# Altium PCB EB1_Spartan_III_1_02.PcbDoc (part 3 of 4)
Units mm, origin at the board's own origin, x right, y up, seen from the top; angles counter-clockwise.
Board outline 165.1 x 115.01 mm, 6 copper layers (Top Layer, MidLayer1, VCC Plane, GND Plane, MidLayer2, Bottom Layer); 356 components, 386 nets, 1788 pads, 779 vias.
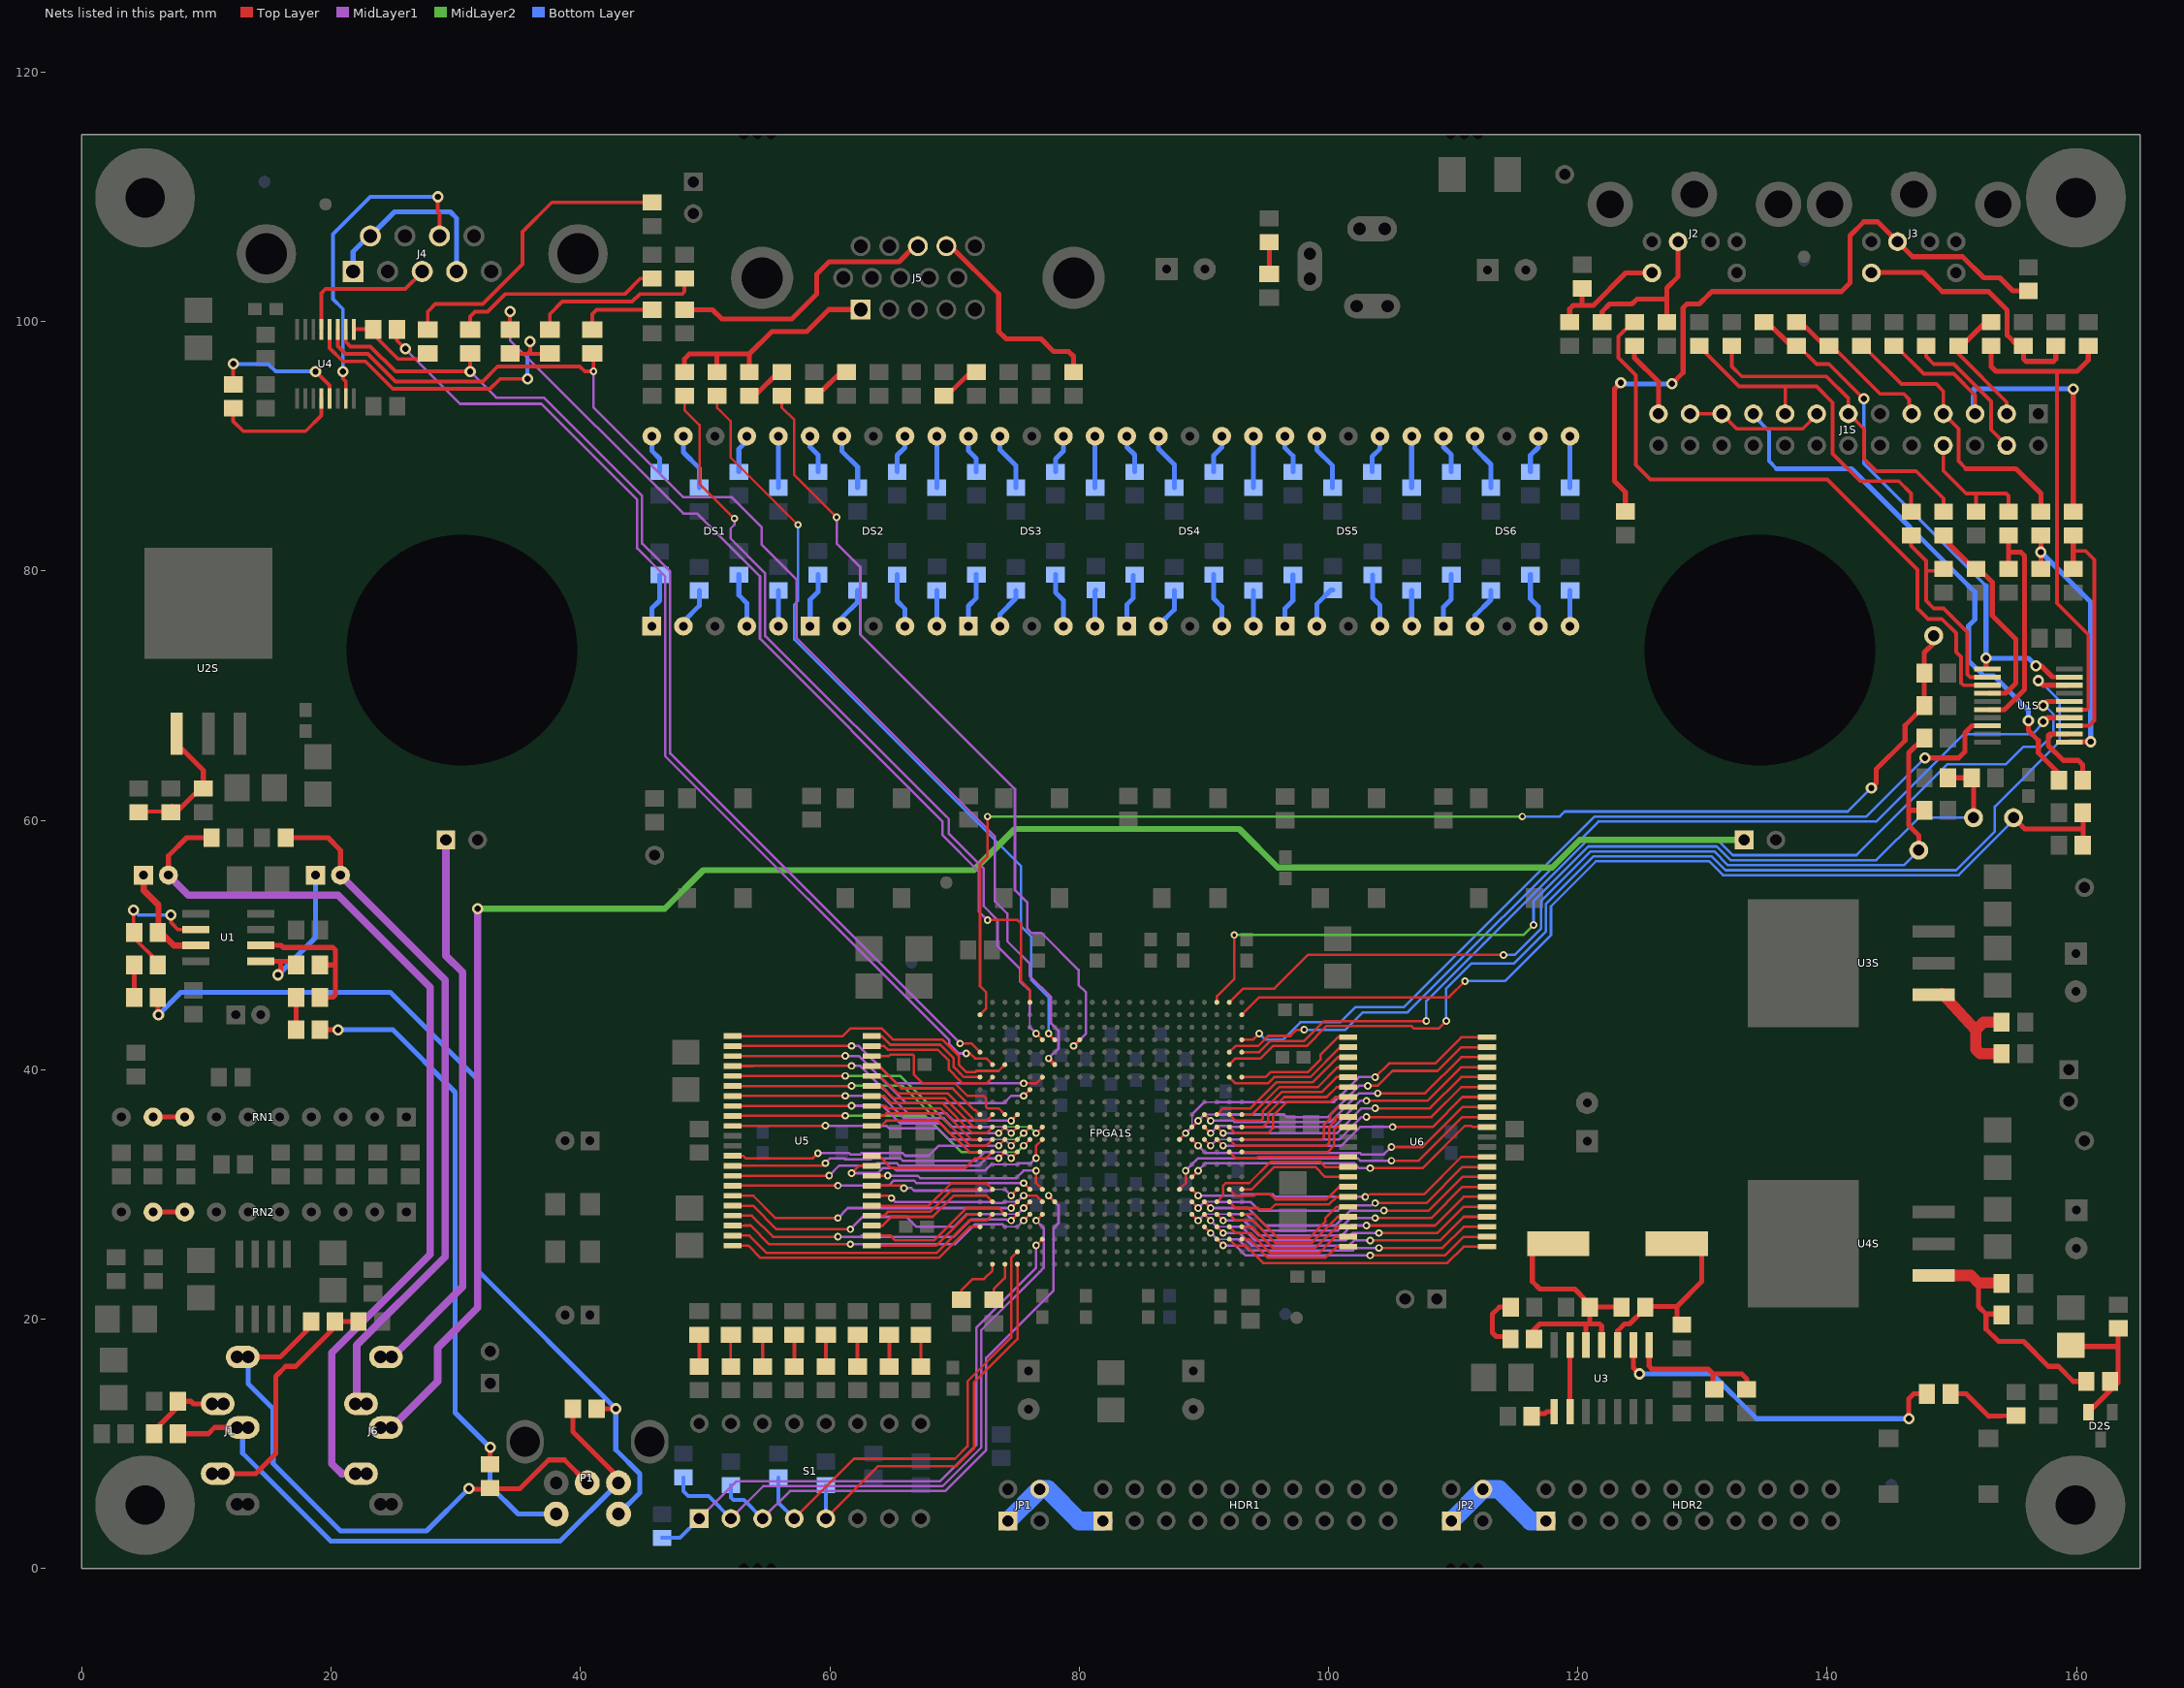
[diagram p7: the nets of this part, all layers, seen from the top]

## Via types
v1: diameter 0.6, hole 0.3, Top Layer to Bottom Layer, tented both sides, 427 vias
v2: diameter 1.6, hole 1, Top Layer to Bottom Layer, 224 vias
v3: diameter 0.9, hole 0.5, Top Layer to Bottom Layer, tented both sides, 126 vias
v4: diameter 1.27, hole 0.711, Top Layer to Bottom Layer, tented both sides, 2 vias

## Nets (pads, with @x,y where several pads share a name; then routed paths per layer and width w, separated by ;. In a path a pad name is that pad's centre, name@x,y a point inside that pad or via, vN(x,y) a via of type N, cw(c..) or ccw(c..) an arc to the next point about the centre after c; other vN are vias at no path point) (continued)
NetC22_1: C22.1 U4.4 | length 10.3
  Top Layer w0.3: C22.1@12.15,93.05 12.15,92 12.95,91.2 17.95,91.2 19.225,92.475 U4.4@19.225,93.825
NetC22_2: C22.2 U4.5 | length 11.1
  Top Layer w0.3: C22.2@12.15,94.95 v3(12.15,96.6) ; v3(18.75,96) 19.875,94.875 U4.5@19.875,93.825
  Bottom Layer w0.3: v3(12.15,96.6) 14.95,96.6 15.55,96 v3(18.75,96)
NetC30_2: C30.2 L1.2 | length 4.9
  Top Layer w0.4: C30.2@114.62,20.955 113.705,20.955 113.15,20.4 113.15,18.9 113.45,18.6 114.6,18.6 L1.2@114.7,18.6
NetC31_1: C31.1 CR1.2 R112.2 U3.3 | length 15.3
  Top Layer w0.4: U3.3@123.19,17.915 123.19,19.04 123.75,19.6 124.15,19.6 R112.2@125.35,20.8 ; R112.2@125.35,21 125.355,21.005 125.41,21.005 127.955,21.005 ; CR1.2@127.94,26.035 129.515,26.035 129.95,25.6 129.95,23 127.955,21.005 ; C31.1@127.95,19.9 127.955,19.905 127.955,21.005
NetC32_2: C32.2 CR1.1 L1.1 R112.1 U3.4 U3.5 | length 23.5
  Top Layer w0.4: L1.1@116.42,18.6 116.42,19.07 116.95,19.6 120.55,19.6 ; CR1.1@118.35,26 116.35,26 116.35,23 116.95,22.4 119.75,22.4 C32.2@120.75,21.4 ; U3.5@120.65,17.915 120.65,19.5 120.55,19.6 ; C32.2@120.95,21 120.95,20.955 120.95,19.6 ; C32.2@120.965,20.955 R112.1@123.51,20.955 ; U3.4@121.92,17.915 121.92,19.43 121.75,19.6 120.95,19.6 ; 120.55,19.6 120.95,19.6
NetC33_1: C33.1 P1.2 R115.2 | length 53.3
  Top Layer w0.4: C33.1@19.1,43.2 v3(20.55,43.2) ; R115.2@32.75,8.3 R115.2@32.75,8.35 v3(32.75,9.7)
  Bottom Layer w0.4: v3(20.55,43.2) 24.95,43.2 29.95,38.2 29.95,12.5 v3(32.75,9.7) 32.75,6.6 34.99,4.36 P1.2@38.05,4.36
NetC33_2: C33.2 R116.1 | length 2.6
  Top Layer w0.4: C33.2@17.2,43.2 R116.1@17.2,45.8
NetC35_1: C35.1 P1.5 R114.2 | length 73.1
  Top Layer w0.4: C35.1@6.1,45.8 6.1,44.45 v3(6.15,44.4) ; R114.2@41.3,12.8 v3(42.85,12.8)
  Bottom Layer w0.4: v3(6.15,44.4) 7.95,46.2 24.75,46.2 31.75,39.2 31.75,23.9 42.84,12.81 42.84,12.8 42.84,9.51 44.75,7.6 44.75,6.06 P1.5@43.05,4.36
NetC35_2: C35.2 R117.1 | length 2.6
  Top Layer w0.4: C35.2@4.2,45.8 R117.1@4.2,48.4
NetC36_1: C36.1 R118.2 U1.1 | length 13.5
  Top Layer w0.4: U1.1@14.35,48.695 15.95,48.695 ; v3(15.75,47.6) 15.95,47.8 15.95,48.695 ; R118.2@17.35,48.6 17.255,48.695 17.2,48.695 15.95,48.695
  Bottom Layer w0.4: v3(15.75,47.6) 18.75,50.6 C36.1@18.75,55.6
NetC36_2: C36.2 J6.4 J6.4A J6.4B R120.2 | length 56.7
  Top Layer w0.4: R120.2@16.35,58.6 19.75,58.6 20.75,57.6 C36.2@20.75,55.6
  MidLayer1 w0.6: C36.2@20.75,55.6 29.15,47.2 29.15,25 22.05,17.9 22.05,13.3 J6.4B@22.15,13.2 ; J6.4B@21.95,13.2 J6.4B@22.15,13.2 ; J6.4A@22.75,13.3 J6.4A@22.65,13.2 ; J6.4A@22.85,13.2 J6.4A@22.65,13.2 ; J6.4B@22.15,13.2 J6.4@22.4,13.2 J6.4A@22.65,13.2
NetC38_1: C38.1 R119.2 U1.7 | length 8.4
  Top Layer w0.5: C38.1@4.95,55.6 4.95,54.4 6.15,53.2 6.15,51.2 6.225,51.125 7.385,49.965 U1.7@9.15,49.965
NetC38_2: C38.2 J6.2 J6.2A J6.2B R121.2 | length 74.9
  Top Layer w0.4: C38.2@6.95,55.6 6.95,57.15 8.4,58.6 R121.2@10.4,58.6
  MidLayer1 w0.6: C38.2@6.95,55.6 8.55,54 20.55,54 27.95,46.6 27.95,25.2 20.05,17.3 20.05,8.4 20.85,7.6 J6.2B@21.95,7.6 J6.2@22.4,7.6 J6.2A@22.85,7.6
NetC79S_2: C79S.2 D2S.2 R30S.1 R38S.2 | length 12.1
  Top Layer w0.4: C79S.2@159.95,17.8 163.35,17.8 ; D2S.2@160.975,12.53 163.073,14.627 163.35,14.905 163.35,15 163.35,17.8 ; R30S.1@163.35,19.25 163.35,17.8
  Top Layer w0.5: 162.55,14.2 163.025,14.675 163.05,14.7 R38S.2@163.05,15
NetDS1_1: DS1.1 R41.1 | length 4.4
  Bottom Layer w0.4: DS1.1@45.72,75.565 45.72,76.99 46.35,77.62 R41.1@46.35,79.67
NetDS1_2: DS1.2 R37.1 | length 3.4
  Bottom Layer w0.4: DS1.2@48.26,75.565 48.26,75.93 49.53,77.2 R37.1@49.53,78.425
NetDS1_4: DS1.4 R33.1 | length 4.4
  Bottom Layer w0.4: R33.1@52.705,79.695 52.705,78.065 53.34,77.43 DS1.4@53.34,75.565
NetDS1_5: DS1.5 R53.1 | length 2.9
  Bottom Layer w0.4: DS1.5@55.88,75.565 R53.1@55.88,78.425
NetDS1_6: DS1.6 R29.1 | length 4.1
  Bottom Layer w0.4: R29.1@55.88,86.675 DS1.6@55.88,90.805
NetDS1_7: DS1.7 R25.1 | length 3.1
  Bottom Layer w0.4: R25.1@52.705,87.945 52.705,89.775 53.34,90.41 DS1.7@53.34,90.805
NetDS1_9: DS1.9 R45.1 | length 4.7
  Bottom Layer w0.4: DS1.9@48.26,90.805 48.26,89.51 49.53,88.24 R45.1@49.53,86.675
NetDS1_10: DS1.10 R49.1 | length 3.1
  Bottom Layer w0.4: DS1.10@45.72,90.805 45.72,89.65 46.355,89.015 R49.1@46.355,87.945
NetDS2_1: DS2.1 R42.1 | length 4.4
  Bottom Layer w0.4: DS2.1@58.42,75.565 58.42,77.69 59.055,78.325 R42.1@59.055,79.695
NetDS2_2: DS2.2 R38.1 | length 3.4
  Bottom Layer w0.4: DS2.2@60.96,75.565 60.96,76.23 62.23,77.5 R38.1@62.23,78.425
NetDS2_4: DS2.4 R34.1 | length 4.4
  Bottom Layer w0.4: R34.1@65.405,79.695 65.405,77.565 66.04,76.93 DS2.4@66.04,75.565
NetDS2_5: DS2.5 R54.1 | length 2.9
  Bottom Layer w0.4: DS2.5@68.58,75.565 R54.1@68.58,78.425
NetDS2_6: DS2.6 R30.1 | length 4.1
  Bottom Layer w0.4: R30.1@68.58,86.675 DS2.6@68.58,90.805
NetDS2_7: DS2.7 R26.1 | length 3.1
  Bottom Layer w0.4: R26.1@65.405,87.945 65.405,89.275 66.04,89.91 DS2.7@66.04,90.805
NetDS2_9: DS2.9 R46.1 | length 4.7
  Bottom Layer w0.4: DS2.9@60.96,90.805 60.96,89.61 62.23,88.34 R46.1@62.23,86.675
NetDS2_10: DS2.10 R50.1 | length 3.1
  Bottom Layer w0.4: DS2.10@58.42,90.805 58.42,89.95 59.055,89.315 R50.1@59.055,87.945
NetDS3_1: DS3.1 R43.1 | length 4.4
  Bottom Layer w0.4: DS3.1@71.12,75.565 71.12,77.19 71.755,77.825 R43.1@71.755,79.695
NetDS3_2: DS3.2 R39.1 | length 3.4
  Bottom Layer w0.4: DS3.2@73.66,75.565 73.66,76.53 74.93,77.8 R39.1@74.93,78.425
NetDS3_4: DS3.4 R35.1 | length 4.4
  Bottom Layer w0.4: R35.1@78.105,79.695 78.105,78.265 78.74,77.63 DS3.4@78.74,75.565
NetDS3_5: DS3.5 R55.1 | length 2.9
  Bottom Layer w0.4: DS3.5@81.28,75.565 81.28,78.4 R55.1@81.35,78.47
NetDS3_6: DS3.6 R31.1 | length 4.1
  Bottom Layer w0.4: R31.1@81.28,86.675 DS3.6@81.28,90.805
NetDS3_7: DS3.7 R27.1 | length 3.1
  Bottom Layer w0.4: R27.1@78.105,87.945 78.105,88.975 78.74,89.61 DS3.7@78.74,90.805
NetDS3_9: DS3.9 R47.1 | length 4.7
  Bottom Layer w0.4: DS3.9@73.66,90.805 73.66,89.71 74.93,88.44 R47.1@74.93,86.675
NetDS3_10: DS3.10 R51.1 | length 3.1
  Bottom Layer w0.4: DS3.10@71.12,90.805 71.12,89.65 71.755,89.015 R51.1@71.755,87.945
NetDS4_1: DS4.1 R44.1 | length 4.3
  Bottom Layer w0.4: DS4.1@83.82,75.565 83.82,77.29 84.35,77.82 R44.1@84.35,79.62
NetDS4_2: DS4.2 R40.1 | length 3.4
  Bottom Layer w0.4: DS4.2@86.36,75.565 86.36,75.63 87.63,76.9 R40.1@87.63,78.425
NetDS4_4: DS4.4 R36.1 | length 4.4
  Bottom Layer w0.4: R36.1@90.805,79.695 90.805,77.765 91.44,77.13 DS4.4@91.44,75.565
NetDS4_5: DS4.5 R56.1 | length 2.9
  Bottom Layer w0.4: DS4.5@93.98,75.565 R56.1@93.98,78.425
NetDS4_6: DS4.6 R32.1 | length 4.1
  Bottom Layer w0.4: R32.1@93.98,86.675 DS4.6@93.98,90.805
NetDS4_7: DS4.7 R28.1 | length 3.1
  Bottom Layer w0.4: R28.1@90.805,87.945 90.805,89.275 91.44,89.91 DS4.7@91.44,90.805
NetDS4_9: DS4.9 R48.1 | length 4.7
  Bottom Layer w0.4: DS4.9@86.36,90.805 86.36,89.81 87.63,88.54 R48.1@87.63,86.675
NetDS4_10: DS4.10 R52.1 | length 3.1
  Bottom Layer w0.4: DS4.10@83.82,90.805 83.82,89.95 84.455,89.315 R52.1@84.455,87.945
NetDS5_1: DS5.1 R65.1 | length 4.4
  Bottom Layer w0.4: DS5.1@96.52,75.565 96.52,76.99 97.15,77.62 R65.1@97.15,79.67
NetDS5_2: DS5.2 R63.1 | length 3.5
  Bottom Layer w0.4: DS5.2@99.06,75.565 99.06,77.33 100.2,78.47 R63.1@100.35,78.47
NetDS5_4: DS5.4 R61.1 | length 4.4
  Bottom Layer w0.4: R61.1@103.54,79.675 103.54,77.83 104.14,77.23 DS5.4@104.14,75.565
NetDS5_5: DS5.5 R71.1 | length 2.9
  Bottom Layer w0.4: DS5.5@106.68,75.565 R71.1@106.68,78.425
NetDS5_6: DS5.6 R59.1 | length 4.1
  Bottom Layer w0.4: R59.1@106.68,86.675 DS5.6@106.68,90.805
NetDS5_7: DS5.7 R57.1 | length 3.1
  Bottom Layer w0.4: R57.1@103.505,87.945 103.505,89.175 104.14,89.81 DS5.7@104.14,90.805
NetDS5_9: DS5.9 R67.1 | length 4.7
  Bottom Layer w0.4: DS5.9@99.06,90.805 99.06,89.71 100.33,88.44 R67.1@100.33,86.675
NetDS5_10: DS5.10 R69.1 | length 3.1
  Bottom Layer w0.4: DS5.10@96.52,90.805 96.52,89.85 97.155,89.215 R69.1@97.155,87.945
NetDS6_1: DS6.1 R66.1 | length 4.4
  Bottom Layer w0.4: DS6.1@109.22,75.565 109.22,77.09 109.855,77.725 R66.1@109.855,79.695
NetDS6_2: DS6.2 R64.1 | length 3.4
  Bottom Layer w0.4: DS6.2@111.76,75.565 111.76,76.43 113.03,77.7 R64.1@113.03,78.425
NetDS6_4: DS6.4 R62.1 | length 4.4
  Bottom Layer w0.4: R62.1@116.205,79.695 116.205,77.765 116.84,77.13 DS6.4@116.84,75.565
NetDS6_5: DS6.5 R72.1 | length 2.9
  Bottom Layer w0.4: DS6.5@119.38,75.565 R72.1@119.38,78.425
NetDS6_6: DS6.6 R60.1 | length 4.1
  Bottom Layer w0.4: R60.1@119.38,86.675 DS6.6@119.38,90.805
NetDS6_7: DS6.7 R58.1 | length 3.1
  Bottom Layer w0.4: R58.1@116.205,87.945 116.205,89.275 116.84,89.91 DS6.7@116.84,90.805
NetDS6_9: DS6.9 R68.1 | length 4.7
  Bottom Layer w0.4: DS6.9@111.76,90.805 111.76,89.81 113.03,88.54 R68.1@113.03,86.675
NetDS6_10: DS6.10 R70.1 | length 3.1
  Bottom Layer w0.4: DS6.10@109.22,90.805 109.22,89.95 109.855,89.315 R70.1@109.855,87.945
NetFPGA1S_A20: FPGA1S.A20 R8S.2 R12S.2 TP4S.1 | length 76.4
  Top Layer w0.2: FPGA1S.A20@91.05,45.4 91.05,45.9 92.45,47.3 v1(92.45,50.8)
  Top Layer w0.4: R8S.2@149.7,63.4 R12S.2@151.6,63.4 151.75,63.25 TP4S.1@151.75,60.2
  MidLayer2 w0.2: v1(92.45,50.8) 115.65,50.8 v1(116.45,51.6)
  Bottom Layer w0.2: v1(116.45,51.6) 116.45,53.5 120.85,57.9 131.15,57.9 132.25,56.8 143.95,56.8 147.35,60.2 TP4S.1@151.75,60.2
NetFPGA1S_A21: FPGA1S.A21 R7S.2 R11S.2 TP3S.1 | length 73.7
  Top Layer w0.2: FPGA1S.A21@92.05,45.4 93.15,46.5 95.65,46.5 98.35,49.2 v1(114.05,49.2)
  Top Layer w0.4: TP3S.1@147.35,57.6 147.35,58.8 146.55,59.6 146.55,60.8 ; R7S.2@147.8,60.8 146.55,60.8 ; R11S.2@147.8,66.6 147.75,66.6 146.55,65.4 146.55,60.8
  Bottom Layer w0.2: v1(114.05,49.2) 114.95,49.2 117.05,51.3 117.05,53.5 121.05,57.5 130.95,57.5 132.05,56.4 146.15,56.4 TP3S.1@147.35,57.6
NetFPGA1S_AB2: FPGA1S.AB2 R3S.2 | length 4.5
  Top Layer w0.2: R3S.2@70.55,21.4 R3S.2@70.625,21.475 ; R3S.2@70.55,21.55 70.55,22.3 71.462,23.212 72.362,23.212 73.05,23.9 FPGA1S.AB2@73.05,24.4
NetFPGA1S_AB3: FPGA1S.AB3 R4S.2 | length 3.2
  Top Layer w0.2: R4S.2@73.15,21.55 73.15,22.4 74.05,23.3 FPGA1S.AB3@74.05,24.4
NetFPGA1S_B1: FPGA1S.B1 R5S.2 R9S.2 TP1S.1 | length 103
  Top Layer w0.2: FPGA1S.B1@72.05,44.4 72.55,44.9 72.55,46.2 72.05,46.7 72.05,56.5 72.65,57.1 v1(72.65,60.3)
  Top Layer w0.4: v3(143.55,62.6) 143.95,63 143.95,64.1 146.25,66.4 146.25,67.6 R9S.2@147.8,69.15 ; R9S.2@147.8,68.85 R9S.2@147.8,69.15 ; TP1S.1@148.55,74.8 148.55,74.2 147.8,73.45 R5S.2@147.8,71.8 R9S.2@147.8,69.2 R9S.2@147.8,69.15
  MidLayer2 w0.2: v1(72.65,60.3) v1(115.55,60.3)
  Bottom Layer w0.2: v1(115.55,60.3) 118.55,60.3 118.95,60.7 141.65,60.7 v3(143.55,62.6)
NetFPGA1S_B22: FPGA1S.B22 R6S.2 R10S.2 TP2S.1 | length 79.4
  Top Layer w0.2: FPGA1S.B22@93.05,44.4 94.45,45.8 109.65,45.8 v1(110.95,47.1)
  Top Layer w0.4: TP2S.1@154.95,60.2 155.85,59.3 160.55,59.3 ; R10S.2@160.5,58 160.55,58.05 160.55,59.3 ; R6S.2@160.55,60.6 160.55,59.3
  Bottom Layer w0.2: v1(110.95,47.1) 114.15,47.1 117.85,50.8 117.85,53.1 121.45,56.7 130.55,56.7 131.65,55.6 150.55,55.6 154.95,60 TP2S.1@154.95,60.2
NetJ1_2: J1.2 J1.2A J1.2B R3.2 R113.1 | length 19.8
  Top Layer w0.4: J1.2A@11.35,7.6 13.95,7.6 15.55,9.2 15.55,15.4 16.35,16.2 17.15,16.2 20.3,19.35 R113.1@20.3,19.8 R3.2@22.2,19.8
NetJ1_4: J1.4 J1.4A J1.4B R1.1 R2.2 | length 6.7
  Top Layer w0.4: R1.1@5.95,11.2 7.7,12.95 R2.2@7.7,13.4 8.75,13.4 8.95,13.2 J1.4B@10.45,13.2 J1.4@10.9,13.2 J1.4A@11.35,13.2
NetJ1S_2: J1S.2 R14S.2 R28S.2 | length 10
  Top Layer w0.3: R14S.2@150.55,98.05 150.55,97.4 154.41,93.54 J1S.2@154.41,92.6
  Top Layer w0.4: R14S.2@150.495,98.05 150.495,98.11 150.55,98.11 150.86,98.11 R28S.2@152.65,99.9
NetJ1S_3: J1S.3 R15S.2 R27S.2 | length 29.5
  Top Layer w0.3: R15S.2@145.35,98.05 145.5,98.05 147.75,95.8 150.15,95.8 151.87,94.08 J1S.3@151.87,92.6
  Top Layer w0.4: R27S.2@159.75,84.75 v3(159.75,94.6)
  Bottom Layer w0.4: J1S.3@151.67,92.6 151.67,92.608 151.75,94.6 v3(159.75,94.6)
NetJ1S_4: J1S.4 R16S.2 R26S.2 | length 23.4
  Top Layer w0.3: R16S.2@142.75,98.05 142.9,98.05 145.95,95 148.75,95 149.33,94.42 J1S.4@149.33,92.6 149.35,92.6 150.55,91.4 150.55,88.8 151.15,88.2 ; J1S.4@149.13,92.6 J1S.4@149.15,92.6
  Top Layer w0.4: 151.15,88.2 155.15,88.2 157.15,86.2 R26S.2@157.15,84.75
NetJ1S_5: J1S.5 R17S.2 R25S.2 | length 12.8
  Top Layer w0.3: R17S.2@140.15,98.05 140.4,98.05 144.25,94.2 146.15,94.2 146.59,93.76 J1S.5@146.59,92.6
  Top Layer w0.4: R25S.2@137.55,99.95 137.9,99.95 139.8,98.05 R17S.2@140.15,98.05
NetJ1S_7: J1S.7 R18S.2 R24S.2 | length 26.4
  Top Layer w0.3: R18S.2@132.35,98.05 132.35,96.4 133.15,95.6 139.95,95.6 141.71,93.84 J1S.7@141.71,92.6 141.75,92.6 142.95,91.4 142.95,89 143.95,88 147.15,88 149.35,85.8 R24S.2@149.35,84.75
  Top Layer w0.4: R24S.2@149.35,84.6 R24S.2@149.35,84.75
NetJ1S_8: J1S.8 J1S.11 J1S.12 | length 11.4
  Top Layer w0.3: J1S.12@129.01,92.6 131.35,92.6 J1S.11@131.55,92.6 132.75,91.4 138.05,91.4 139.17,92.52 J1S.8@139.17,92.6
  Top Layer w0.4: J1S.12@128.812,92.664 J1S.12@129.011,92.659
NetJ1S_9: J1S.9 R19S.2 R23S.2 | length 28.1
  Top Layer w0.3: R19S.2@129.75,98.05 129.75,98 132.95,94.8 136.65,94.8 ; J1S.9@136.63,92.6 136.63,92.62 136.65,92.64 136.65,94.8 ; R23S.2@146.75,84.75 146.75,86.2 145.75,87.2 142.65,87.2 140.45,89.4 140.45,93.5 139.15,94.8 136.65,94.8
  Top Layer w0.4: R19S.2@129.75,98.05 R19S.2@129.75,98.2
NetJ1S_10: J1S.10 R22S.2 | length 43.9
  Top Layer w0.4: v3(156.15,68) 156.15,67.2 156.95,66.4 156.95,65.4 158.6,63.75 R22S.2@158.6,63.2
  Bottom Layer w0.3: J1S.10@134.09,92.6 134.09,92.46 135.35,91.2 135.35,88.8 135.95,88.2
  Bottom Layer w0.4: 135.95,88.2 141.95,88.2 151.35,78.8 151.85,78.3 151.85,76.1 151.35,75.6 151.35,72.8 152.55,71.6 153.35,71.6 156.15,68.8 v3(156.15,68)
NetJ1S_13: J1S.13 R21S.2 | length 6.4
  Top Layer w0.4: R21S.2@124.46,97.91 R21S.2@124.55,98 ; R21S.2@124.55,98.05 R21S.2@124.55,98 ; J1S.13@126.47,92.6 126.47,95.18 124.55,97.1 R21S.2@124.55,98
NetJ1S_15: J1S.15 R20S.2 | length 11.6
  Top Layer w0.3: R20S.2@147.95,98.05 147.95,97.2 148.55,96.6 150.15,96.6 153.15,93.6 153.15,91.32 J1S.15@154.41,90.06
NetJ1S_17: J1S.17 R13S.2 R29S.2 | length 10.8
  Top Layer w0.3: J1S.17@149.33,90.06 149.33,88.02 151.15,86.2 151.95,86.2 ; R13S.2@151.95,84.75 151.95,86.2 ; R29S.2@154.55,84.75 154.55,86 154.35,86.2 151.95,86.2
NetJ2_1: J2.1 R87.2 R88.2 | length 13.3
  Top Layer w0.4: R88.2@121.95,99.95 121.95,100.8 122.55,101.4 124.35,101.4 124.75,101.8 127.15,101.8 ; R87.2@127.15,99.95 127.15,101.8 ; J2.1@128.05,106.4 128.05,103.6 127.15,102.7 127.15,101.8
NetJ2_6: J2.6 R86.2 R89.2 | length 10.2
  Top Layer w0.4: R89.2@119.35,99.95 119.35,101 119.65,101.3 120.35,101.3 ; R86.2@120.35,102.65 120.35,101.3 ; J2.6@125.95,103.9 123.85,103.9 121.25,101.3 120.35,101.3
NetJ3_1: J3.1 R85.2 R92.2 | length 56.6
  Top Layer w0.4: v3(123.45,95.1) 122.95,94.6 122.95,87.2 123.825,86.325 R92.2@123.825,84.77 ; v3(127.55,95) 128.45,95.9 128.45,101.1 128.75,101.4 129.75,101.4 130.55,102.2 130.75,102.4 141.15,102.4 141.85,103.1 141.85,106.9 142.95,108 144.05,108 J3.1@145.65,106.4 146.85,105.2 150.87,105.2 152.57,103.5 153.85,103.5 154.9,102.45 R85.2@156.15,102.45
  Bottom Layer w0.4: v3(123.45,95.1) 123.55,95 v3(127.55,95)
NetJ3_6: J3.6 R84.2 R93.2 | length 20.2
  Top Layer w0.4: J3.6@144.07,103.935 147.715,103.935 149.25,102.4 152.95,102.4 154.45,100.9 154.45,98.9 155.3,98.05 R84.2@155.75,98.05 155.75,97 155.95,96.8 158.15,96.8 158.35,97 R93.2@158.35,98.05
NetJ4_1: J4.1 J4.4 J4.6 | length 15.7
  Bottom Layer w0.4: J4.1@21.765,104.015 21.765,105.615 23.005,106.855 J4.6@23.15,106.855 25.095,108.8 29.55,108.8 30.075,108.275 J4.4@30.075,104.015
NetJ5_13: J5.13 R94.2 | length 22.4
  Top Layer w0.4: R94.2@48.35,100.95 50.6,100.95 51.35,100.2 56.95,100.2 58.95,102.2 58.95,103.8 59.95,104.8 65.55,104.8 66.836,106.086 67.064,106.086 J5.13@67.064,106.045
NetJ5_14: J5.14 R95.2 | length 16.9
  Top Layer w0.4: J5.14@69.354,106.045 69.705,106.045 73.55,102.2 73.55,99.2 74.15,98.6 76.95,98.6 77.95,97.6 79.15,97.6 79.55,97.2 R95.2@79.55,95.95
NetLD0_2: LD0.2 R74.2 | length 2.5
  Top Layer w0.3: R74.2@49.53,16.19 LD0.2@49.53,18.735
NetLD1_2: LD1.2 R75.2 | length 2.6
  Top Layer w0.2: R75.2@52.05,16.1 52.05,16.19 LD1.2@52.05,18.7
NetLD2_2: LD2.2 R76.2 | length 2.5
  Top Layer w0.3: R76.2@54.61,16.19 LD2.2@54.61,18.735
NetLD3_2: LD3.2 R77.2 | length 2.5
  Top Layer w0.3: R77.2@57.15,16.19 LD3.2@57.15,18.735
NetLD4_2: LD4.2 R78.2 | length 2.5
  Top Layer w0.3: R78.2@59.69,16.19 LD4.2@59.69,18.735
NetLD5_2: LD5.2 R79.2 | length 2.5
  Top Layer w0.3: R79.2@62.23,16.19 LD5.2@62.23,18.735
NetLD6_2: LD6.2 R80.2 | length 2.5
  Top Layer w0.3: R80.2@64.77,16.19 LD6.2@64.77,18.735
NetLD7_2: LD7.2 R81.2 | length 2.5
  Top Layer w0.2: R81.2@67.31,16.19 LD7.2@67.31,18.735
NetLED1_2: LED1.2 R83.2 | length 2.5
  Top Layer w0.4: LED1.2@95.25,103.82 R83.2@95.25,106.365
NetLED2_1: LED2.1 R73.1 | length 6.7
  Top Layer w0.4: LED2.1@149.55,14.6 LED2.1@150.025,14.125 ; LED2.1@149.9,14 151.15,14 152.95,12.2 R73.1@155.15,12.25
NetLED2_2: LED2.2 U3.2 | length 28.8
  Top Layer w0.4: U3.2@124.46,17.915 124.46,16.09 v3(124.95,15.6) ; v3(146.55,12) 146.55,13.6 146.95,14 LED2.2@148,14
  Bottom Layer w0.4: v3(124.95,15.6) 130.75,15.6 134.35,12 v3(146.55,12)
NetLED4_1: LED4.1 R96.1 | length 6.2
  Top Layer w0.3: LED4.1@40.95,99.35 40.95,100.6 41.3,100.95 R96.1@45.75,100.95
NetLED5_1: LED5.1 R97.1 | length 16.9
  Top Layer w0.3: LED5.1@31.15,99.35 31.15,100.4 31.55,100.8 32.55,100.8 33.95,102.2 43.55,102.2 44.8,103.45 R97.1@45.75,103.45
NetLED6_1: LED6.1 R98.1 | length 13.8
  Top Layer w0.3: LED6.1@37.55,99.35 37.55,100.6 38.55,101.6 44.15,101.6 44.75,102.2 48.15,102.2 48.35,102.4 R98.1@48.35,103.45
NetLED6_2: LED6.2 R90.2 U4.12 | length 25.7
  Top Layer w0.3: U4.12@19.875,99.375 19.875,97.875 20.95,96.8 22.75,96.8 24.95,94.6 32.75,94.6 33.55,95.4 v3(35.75,95.4) ; R90.2@34.75,97.4 35.95,97.4 ; v3(35.95,98.4) 35.95,97.4 ; LED6.2@37.35,97.4 35.95,97.4
  Bottom Layer w0.3: v3(35.75,95.4) 35.75,97.4 35.95,97.6 v3(35.95,98.4)
NetLED7_1: LED7.1 R99.1 | length 24.6
  Top Layer w0.3: LED7.1@27.75,99.35 27.75,100.8 28.35,101.4 32.15,101.4 35.35,104.6 35.35,107.2 37.7,109.55 R99.1@45.75,109.55
NetLED7_2: LED7.2 R91.2 U4.9 | length 7.3
  Top Layer w0.3: U4.9@21.825,99.375 R91.2@23.375,99.375 23.375,98.975 25.35,97 27.75,97 LED7.2@27.95,97
NetR24_2: R24.2 R82.2 U3.1 | length 11.8
  Top Layer w0.4: U3.1@125.73,17.915 125.73,16.22 125.95,16 130.45,16 130.85,15.6 ; R82.2@130.85,14.6 130.85,15.6 ; R24.2@133.55,14.35 133.55,15.2 133.15,15.6 130.85,15.6
NetR31S_2: R31S.2 R37S.1 R38S.1 U4S.1 | length 20
  Top Layer w0.4: 152.15,22.9 152.15,21 152.75,20.4 ; R31S.2@153.99,20.32 153.91,20.4 152.75,20.4 ; R38S.1@160.8,15 159.75,15 158.55,16.2 157.75,16.2 155.75,18.2 153.75,18.2 152.75,19.2 152.75,20.4
  Top Layer w0.9: U4S.1@149.225,23.495 151.555,23.495 152.15,22.9 153.95,22.9 R37S.1@153.99,22.86
NetR32S_1: R32S.1 R35S.2 R36S.2 U2S.1 | length 11.1
  Top Layer w0.3: R35S.2@4.55,60.7 7.15,60.7 R36S.2@7.275,60.825
  Top Layer w0.4: R36S.2@7.15,61 7.175,61.025 7.275,61.125 R36S.2@7.225,61.075 ; R36S.2@7.275,60.825 R36S.2@7.325,60.875 ; R36S.2@7.325,60.375 7.375,60.425 R32S.1@9.25,62.3 ; U2S.1@7.61,66.95 7.61,66.14 9.75,64 9.75,63.15 R32S.1@9.75,62.55
NetR33S_1: R33S.1 R34S.2 U3S.1 | length 10
  Top Layer w0.9: U3S.1@149.25,46.1 151.93,43.18 ; R34S.2@153.99,41.275 152.275,41.275 151.93,41.62 151.93,43.18 ; R33S.1@153.99,43.815 152.565,43.815 151.93,43.18
NetR100_2: R100.2 R101.1 | length 3.2
  Top Layer w0.3: R101.1@53.55,94.05 R101.1@54,94.05
  Top Layer w0.4: R101.1@54,94.05 R100.2@55.95,96
NetR103_2: R103.2 R104.1 | length 3.3
  Top Layer w0.4: R104.1@58.75,94.05 59,94.05 61.125,96.175 R103.2@61.15,96.2
NetR106_2: R106.2 R107.1 | length 3.6
  Top Layer w0.4: R107.1@68.95,94 69.15,94 69.35,94 71.3,95.95 R106.2@71.75,95.95
NetR116_2: R116.2 R118.1 U1.2 | length 12.3
  Top Layer w0.4: U1.2@14.35,49.965 15.985,49.965 16.15,49.8 20.15,49.8 20.35,49.6 20.35,48.4 ; R116.2@19.1,45.8 20.15,45.8 20.35,46 20.35,48.4 ; R118.1@19.1,48.4 20.35,48.4
NetR117_2: R117.2 R119.1 U1.6 | length 11
  Top Layer w0.3: v3(4.15,52.8) 4.15,51 4.15,50.6 R117.2@6.15,48.6 ; v3(7.15,52.4) 7.15,51.8 7.715,51.235 U1.6@9.15,51.235
  Bottom Layer w0.3: v3(4.15,52.8) 4.55,52.4 v3(7.15,52.4)
NetR122_2: R122.2 U3.8 | length 1.9
  Top Layer w0.4: R122.2@116.3,12.4 117.35,12.4 117.515,12.565 U3.8@118.11,12.565
NetRN1_8: RN1.8 RN1.9 | length 2.5
  Top Layer w0.4: RN1.9@5.715,36.195 RN1.8@8.255,36.195
NetRN2_8: RN2.8 RN2.9 | length 2.5
  Top Layer w0.4: RN2.9@5.715,28.575 RN2.8@8.255,28.575
NetU3_6: U3.6 U3.9 | length 5.4
  Top Layer w0.4: U3.9@119.38,12.565 U3.6@119.38,17.915
POT_IN_L: J1.5 J1.5A J1.5B P1.1 R113.2 R115.1 | length 46.4
  Top Layer w0.4: J1.5A@13.35,16.95 15.9,16.95 18.35,19.4 R113.2@18.35,19.8 ; v3(31.05,6.4) 31.1,6.35 32.75,6.35 32.8,6.4 35.15,6.4 37.45,8.7 38.71,8.7 P1.1@40.55,6.86
  Bottom Layer w0.4: J1.5A@13.35,16.95 13.35,14.8 15.35,12.8 15.35,8.4 20.75,3 27.65,3 v3(31.05,6.4)
POT_IN_R: J1.3 J1.3A J1.3B P1.4 R1.2 R114.1 | length 49.9
  Top Layer w0.4: R1.2@7.7,10.8 10.15,10.8 10.65,11.3 J1.3B@12.45,11.3 J1.3@12.9,11.3 ; R114.1@39.4,12.8 39.4,10.95 43.05,7.3 P1.4@43.05,6.86
  Bottom Layer w0.4: J1.3@12.9,11.3 12.9,9.25 15.241,6.909 19.95,2.2 38.39,2.2 P1.4@43.05,6.86
PP_CTRL: C65S.1 R25S.1 U1S.1 U1S.19 | length 43.3
  Top Layer w0.3: R25S.1@137.55,98.05 137.7,98.05 139.15,96.6 140.15,96.6 v3(142.95,93.8)
  Top Layer w0.4: C65S.1@135.05,100.1 135.075,100.075 137.05,98.1 R25S.1@137.45,98.1 ; U1S.1@152.75,72.2 v3(152.75,73) ; v3(156.75,72.4) 157.15,72.4 158.05,71.5 U1S.19@159.425,71.475
  Bottom Layer w0.3: v3(142.95,93.8) 142.95,88.6 152.75,78.8
  Bottom Layer w0.4: 152.75,78.8 v3(152.75,73) 156.15,73 v3(156.75,72.4)
PP_HARD_TCK: C63S.1 R27S.1 U1S.13 | length 19.7
  Top Layer w0.3: U1S.13@159.425,67.575 161.025,67.575 161.45,68 161.45,80.9 160.75,81.6 159.75,81.6
  Top Layer w0.4: C63S.1@159.75,80.15 159.75,81.6 R27S.1@159.75,82.8
PP_HARD_TDI: C62S.1 R28S.1 U1S.15 | length 40.8
  Top Layer w0.3: 158.45,96 158.45,77.4 160.95,74.9 160.95,69 160.825,68.875 U1S.15@159.425,68.875
  Top Layer w0.4: R28S.1@153.15,98.05 153.15,96.4 153.55,96 158.45,96 160.05,96 160.95,96.9 C62S.1@160.95,98.05
PP_HARD_TDO: R21S.1 U1S.3 | length 52.1
  Top Layer w0.3: R21S.1@124.55,99.95 124.4,99.95 123.25,98.8 123.25,97.1 124.65,95.7 124.65,88.5 125.827,87.323 140.027,87.323 147.25,80.1 147.25,77 148.113,76.137 149.213,76.137 150.35,75 150.35,73.5 150.75,73.1 150.75,71 150.925,70.825 U1S.3@152.875,70.825
PP_HARD_TMS: C64S.1 R26S.1 U1S.11 | length 21.2
  Top Layer w0.4: C64S.1@157.15,80.15 v3(157.15,81.5) R26S.1@157.15,82.8 ; U1S.11@159.425,66.275 159.45,66.3 v3(161.15,66.3)
  Bottom Layer w0.4: v3(157.15,81.5) 161.15,77.5 v3(161.15,66.3)
PP_SOFT_TCK: C67S.1 R23S.1 U1S.2 | length 16.6
  Top Layer w0.3: R23S.1@146.75,82.85 146.75,82 147.95,80.8 147.95,80 ; C67S.1@148.95,80 147.95,80 ; U1S.2@152.875,71.475 151.475,71.475 151.25,71.7 151.25,75.1 149.35,77 148.55,77 147.95,77.6 147.95,80
  Top Layer w0.4: R23S.1@146.75,82.75 R23S.1@146.75,82.85 ; C67S.1@149.35,80.15 C67S.1@149.6,80.15
PP_SOFT_TDI: C66S.1 R24S.1 U1S.4 | length 17
  Top Layer w0.4: R24S.1@149.35,82.85 149.35,82.6 151.875,80.075 C66S.1@151.95,80 ; C66S.1@152.15,80.2 153.25,79.1 153.25,76.4 155.15,74.5 155.15,71 154.65,70.5 154.325,70.175 U1S.4@152.875,70.175
PP_SOFT_TDO: R22S.1 U1S.12 | length 7.2
  Top Layer w0.4: U1S.12@159.425,66.925 157.875,66.925 157.75,66.8 157.75,66 158.95,64.8 160.15,64.8 160.5,64.45 R22S.1@160.5,63.2
PP_SOFT_TMS: C61S.1 R29S.1 U1S.6 | length 18.5
  Top Layer w0.4: U1S.6@152.875,68.875 154.225,68.875 155.85,70.5 155.85,81.2 155.55,81.5 154.55,81.5 ; C61S.1@154.55,80.15 154.55,81.5 ; R29S.1@154.55,82.85 154.55,81.5
PWR_USER_1: HDR1.1 JP1.1 JP1.4 | length 9.7
  Bottom Layer w1.5: JP1.1@74.295,3.81 JP1.4@76.835,6.35 77.47,6.35 80.01,3.81 HDR1.1@81.915,3.81
PWR_USER_2: HDR2.1 JP2.1 JP2.4 | length 9.7
  Bottom Layer w1.5: JP2.1@109.855,3.81 JP2.4@112.395,6.35 113.665,6.35 116.205,3.81 HDR2.1@117.44,3.81 HDR2.1@117.475,3.81
RED0: FPGA1S.D9 R100.1 | length 63.8
  Top Layer w0.2: R100.1@56.15,94.05 56.15,93.1 57.15,92.1 57.15,87.7 v1(60.55,84.3) ; v1(79.55,41.9) FPGA1S.D9@80.05,42.4
  MidLayer1 w0.2: v1(60.55,84.3) 60.55,82.2 62.45,80.3 62.45,74.9 74.85,62.5 74.85,54.4 75.85,53.4 75.85,51.3 76.187,50.963 76.987,50.963 79.95,48 79.95,46.8 80.55,46.2 80.55,42.9 v1(79.55,41.9)
RED1: FPGA1S.D7 R102.1 | length 63.1
  Top Layer w0.2: R102.1@50.95,94.05 50.95,93.1 51.216,92.834 52.05,92 52.05,89.1 v1(57.45,83.7) ; v1(77.55,42.9) FPGA1S.D7@78.05,42.4
  Bottom Layer w0.2: v1(57.45,83.7) 57.45,77.6 57.15,77.3 57.15,74.5 75.35,56.3 75.35,51.5 76.15,50.7 76.15,47.2 77.55,45.8 v1(77.55,42.9)
RED2: FPGA1S.D6 R109.1 | length 63.8
  Top Layer w0.2: R109.1@48.35,94.05 48.35,92.9 49.55,91.7 49.55,87 v1(52.35,84.2) ; v1(76.55,42.9) FPGA1S.D6@77.05,42.4
  MidLayer1 w0.127: 76.05,43.4 76.05,44.4
  MidLayer1 w0.2: v1(52.35,84.2) 52.35,83.7 52.05,83.4 52.05,82.6 54.825,79.775 54.825,74.775 69.246,60.395 ; 69.25,60.4 69.55,60.1 69.55,60.092 ; 69.546,60.096 69.55,60.092 ; 76.05,43.4 v1(76.55,42.9) ; 76.05,44.4 76.05,46.3 75.25,47.1 75.25,48.1 73.45,49.9 73.45,52 72.35,53.1 72.35,56.1 69.55,58.9 69.55,60.092
RED#: J5.1 R101.2 R102.2 R109.2 | length 19.7
  Top Layer w0.4: R109.2@48.35,95.95 48.35,97 48.75,97.4 50.95,97.4 ; R102.2@50.95,95.95 50.95,97.4 ; R101.2@53.55,95.95 53.55,97.4 ; J5.1@62.484,100.965 59.915,100.965 58.15,99.2 55.35,99.2 53.55,97.4 ; 50.95,97.4 53.55,97.4
RS232_CTS: FPGA1S.F2 R91.1 | length 83.6
  Top Layer w0.2: v1(70.95,41.3) 71.25,41.3 71.65,40.9 72.55,40.9 FPGA1S.F2@73.05,40.4
  Top Layer w0.3: R91.1@25.275,99.375 25.275,98.475 v3(25.95,97.8)
  MidLayer1 w0.2: v3(25.95,97.8) 30.35,93.4 36.85,93.4 44.55,85.7 44.55,81.8 46.801,79.549 46.801,65.149 69.572,42.378 69.572,42.078 70.35,41.3 v1(70.95,41.3)
RS232_RTS: FPGA1S.E1 LED5.2 U4.10 | length 87.9
  Top Layer w0.2: v1(70.45,42.1) 71.35,42.1 FPGA1S.E1@72.05,41.4
  Top Layer w0.3: U4.10@21.175,99.375 21.175,98.375 21.55,98 23.15,98 25.15,96 v3(31.15,96) 31.15,96.2 LED5.2@31.15,97.45
  MidLayer1 w0.2: v3@31.15,95.8 v3(31.15,96) 33.25,93.9 37.05,93.9 44.95,86 44.95,82.2 47.201,79.949 47.201,65.349 v1(70.45,42.1)
RS232_RX: FPGA1S.A5 R90.1 | length 76.2
  Top Layer w0.2: v1(72.65,52) 75.05,52 75.35,51.7 75.35,47.1 76.05,46.4 FPGA1S.A5@76.05,45.4
  Top Layer w0.3: R90.1@34.35,99.35 v3(34.35,100.8)
  MidLayer1 w0.2: v3(34.35,100.8) 34.35,98.5 48.25,84.6 49.35,84.6 52.15,81.8 ; 52.152,81.802 54.399,79.576 54.399,74.576 69.052,59.902 ; 69.05,59.9 69.05,58.8 71.95,55.9 71.95,52.7 v1(72.65,52)
RS232_TX: FPGA1S.F7 LED4.2 U4.11 | length 100
  Top Layer w0.3: U4.11@20.525,99.375 20.525,98.025 21.15,97.4 22.95,97.4 25.15,95.2 32.15,95.2 33.35,96.4 39.95,96.4 40.35,96 v1(41.05,96) 41.05,97.2 41.045,97.198 40.489,96.988 LED4.2@40.95,97.45 ; v1(77.55,40.9) FPGA1S.F7@78.05,40.4
  MidLayer1 w0.2: v1(41.05,96) 41.05,93.1 48.25,85.9 52.15,85.9 54.55,83.5 54.55,82.1 57.35,79.3 57.35,74.6 73.25,58.7 73.25,53.5 74.25,52.5 74.25,50.3 76.05,48.5 76.05,47.5 77.75,45.8 77.75,43.7 78.35,43.1 78.35,41.7 v1(77.55,40.9)
RTS: J4.8 U4.7 | length 26.4
  Top Layer w0.3: v3(20.95,96) 20.95,95.425 21.175,95.2 U4.7@21.175,93.825 ; v3(28.55,110) 28.55,108.8 28.69,108.66 J4.8@28.69,106.855
  Bottom Layer w0.3: v3(20.95,96) 20.95,101 20.15,101.8 20.15,107 23.15,110 v3(28.55,110)
RX: J4.3 U4.13 | length 11.7
  Top Layer w0.3: U4.13@19.225,99.375 19.225,102.275 19.55,102.6 25.95,102.6 27.305,103.955 J4.3@27.305,104.015
SOFT_TCK: FPGA1S.F21 U1S.18 | length 90.7
  Top Layer w0.2: FPGA1S.F21@92.05,40.4 92.55,40.9 94.55,40.9 95.55,41.9 98.25,41.9 99.85,43.5 106.65,43.5 106.85,43.3 108.85,43.3 v1(109.45,43.9)
  Top Layer w0.4: v3(156.95,71.2) 157.325,70.825 U1S.18@159.425,70.825
  Bottom Layer w0.2: v1(109.45,43.9) 109.45,46.5 111.45,48.5 114.85,48.5 117.45,51.1 117.45,53.3 121.25,57.1 130.75,57.1 131.85,56 150.35,56 153.45,59.1 153.45,61.1 158.65,66.3 158.65,69.6 157.05,71.2 v3(156.95,71.2)
SOFT_TDI: FPGA1S.E22 U1S.16 | length 82.4
  Top Layer w0.2: FPGA1S.E22@93.05,41.4 94.45,41.4 95.35,42.3 98.05,42.3 98.65,42.9 99.65,43.9 v1(107.85,43.9)
  Top Layer w0.4: v3(157.35,69.2) 157.675,69.525 U1S.16@159.425,69.525
  Bottom Layer w0.2: v1(107.85,43.9) 107.85,45.5 112.45,50.1 120.65,58.3 131.35,58.3 132.45,57.2 142.35,57.2 149.65,64.5 154.35,64.5 155.75,65.9 157.15,65.9 158.15,66.9 158.15,68.5 157.45,69.2 v3(157.35,69.2)
SOFT_TDO: FPGA1S.D22 U1S.8 | length 71.5
  Top Layer w0.2: FPGA1S.D22@93.05,42.4 93.95,42.4 v1(94.45,42.9)
  Top Layer w0.4: v3(147.85,65) 150.55,65 151.05,65.5 151.05,67 151.625,67.575 U1S.8@152.875,67.575
  Bottom Layer w0.2: v1(94.45,42.9) 94.95,42.4 96.35,42.4 97.75,43.8 100.95,43.8 102.15,45 106.05,45 121.35,60.3 143.15,60.3 v3(147.85,65)
SOFT_TMS: FPGA1S.E21 U1S.14 | length 78.5
  Top Layer w0.2: FPGA1S.E21@92.05,41.4 92.55,41.9 94.35,41.9 95.15,42.7 96.95,42.7 97.45,43.2 v1(98.05,43.2)
  Top Layer w0.4: v3(157.35,67.9) 157.675,68.225 U1S.14@159.425,68.225
  Bottom Layer w0.2: v1(98.05,43.2) 101.35,43.2 102.75,44.6 106.35,44.6 121.65,59.9 143.95,59.9 150.95,66.9 156.45,66.9 157.35,67.8 v3(157.35,67.9)
SPKR_L: J6.5 J6.5A J6.5B LS2.1 | length 44.4
  MidLayer1 w0.6: J6.5A@24.85,16.95 24.9,16.95 30.55,22.6 30.55,47.8 29.21,49.14 LS2.1@29.21,58.42
SPKR_R: J6.3 J6.3A J6.3B LS1.1 | length 152.1
  MidLayer1 w0.6: J6.3B@23.75,11.3 23.85,11.2 24.05,11 24.4,11 J6.3A@24.85,11 ; J6.3A@24.85,11.3 28.55,15 28.55,17.7 31.75,20.9 v3(31.75,52.9)
  MidLayer2 w0.5: v3(31.75,52.9) 46.75,52.9 49.85,56 71.55,56 74.85,59.3 92.85,59.3 95.95,56.2 117.95,56.2 120.17,58.42 LS1.1@133.35,58.42
SRAM0_A0: FPGA1S.L6 U5.5 | length 27
  Top Layer w0.2: U5.5@52.21,39.49 61.24,39.49 v1(61.25,39.5) ; v1(76.55,34.9) FPGA1S.L6@77.05,35.4
  MidLayer2 w0.127: 73.05,35.4 76.05,35.4
  MidLayer2 w0.2: v1(61.25,39.5) 65.65,39.5 69.75,35.4 73.05,35.4 ; 76.05,35.4 v1(76.55,34.9)
SRAM0_A1: FPGA1S.K4 U5.4 | length 24.9
  Top Layer w0.2: U5.4@52.21,40.29 53.84,40.29 53.85,40.3 v1(61.75,40.3) ; v1(74.55,35.9) FPGA1S.K4@75.05,36.4
  MidLayer1 w0.2: v1(61.75,40.3) 62.45,40.3 66.25,36.5 69.35,36.5 69.95,35.9 v1(74.55,35.9)
SRAM0_A2: FPGA1S.H5 U5.3 | length 25.9
  Top Layer w0.2: U5.3@52.21,41.09 61.24,41.09 v1(61.25,41.1) ; v1(75.55,37.9) FPGA1S.H5@76.05,38.4
  MidLayer1 w0.2: v1(61.25,41.1) 62.35,41.1 66.15,37.3 73.95,37.3 74.55,37.9 v1(75.55,37.9)
SRAM0_A3: FPGA1S.G6 U5.2 | length 26.3
  Top Layer w0.2: U5.2@52.21,41.89 61.74,41.89 v1(61.75,41.9) ; v1(75.55,38.9) 76.55,38.9 FPGA1S.G6@77.05,39.4
  MidLayer1 w0.2: v1(61.75,41.9) 62.35,41.9 64.673,39.577 65.35,38.9 v1(75.55,38.9)
SRAM0_A4: FPGA1S.F3 U5.1 | length 24.2
  Top Layer w0.2: U5.1@52.21,42.69 61.04,42.69 61.65,43.3 64.184,43.3 65.084,42.4 65.15,42.4 69.05,42.4 70.35,41.1 70.35,40.4 70.95,39.8 71.65,39.8 71.75,39.9 73.55,39.9 FPGA1S.F3@74.05,40.4
SRAM0_A5: FPGA1S.G1 U5.44 | length 10.5
  Top Layer w0.2: U5.44@63.36,42.69 64.16,42.69 64.85,42 68.85,42 69.95,40.9 69.95,40.2 70.45,39.7 70.75,39.4 FPGA1S.G1@72.05,39.4
SRAM0_A6: FPGA1S.G2 U5.43 | length 11.5
  Top Layer w0.2: U5.43@63.36,41.89 64.36,41.89 64.65,41.6 68.65,41.6 69.55,40.7 69.55,40 70.387,39.163 70.65,38.9 72.55,38.9 FPGA1S.G2@73.05,39.4
SRAM0_A7: FPGA1S.K3 U5.42 | length 14
  Top Layer w0.2: U5.42@63.36,41.09 64.74,41.09 64.85,41.2 66.65,41.2 66.75,41.1 66.75,39.6 67.45,38.9 70.05,38.9 71.05,37.9 72.35,37.9 72.55,37.7 72.55,37 72.65,36.9 73.55,36.9 FPGA1S.K3@74.05,36.4
SRAM0_A8: FPGA1S.T2 U5.27 | length 10.6
  Top Layer w0.2: U5.27@63.36,29.09 67.94,29.09 69.75,30.9 72.55,30.9 FPGA1S.T2@73.05,30.4
SRAM0_A9: FPGA1S.T1 U5.26 | length 9.6
  Top Layer w0.2: U5.26@63.36,28.29 64.34,28.29 64.65,28.6 68.05,28.6 69.85,30.4 FPGA1S.T1@72.05,30.4
SRAM0_A10: FPGA1S.U2 U5.25 | length 10.9
  Top Layer w0.2: U5.25@63.36,27.49 64.24,27.49 64.95,28.2 68.25,28.2 69.95,29.9 72.55,29.9 FPGA1S.U2@73.05,29.4
SRAM0_A11: FPGA1S.V3 U5.24 | length 12.1
  Top Layer w0.2: U5.24@63.36,26.69 64.86,26.69 65.25,26.3 68.35,26.3 70.95,28.9 73.55,28.9 FPGA1S.V3@74.05,28.4
SRAM0_A12: FPGA1S.V1 U5.23 | length 9.7
  Top Layer w0.2: U5.23@63.36,25.89 68.54,25.89 71.05,28.4 FPGA1S.V1@72.05,28.4
SRAM0_A13: FPGA1S.W1 U5.22 | length 21.3
  Top Layer w0.2: U5.22@52.21,25.89 53.46,25.89 54.45,24.9 68.75,24.9 71.25,27.4 FPGA1S.W1@72.05,27.4
SRAM0_A14: FPGA1S.V2 U5.21 | length 22.7
  Top Layer w0.2: U5.21@52.21,26.69 53.56,26.69 54.95,25.3 68.55,25.3 71.15,27.9 72.55,27.9 FPGA1S.V2@73.05,28.4
SRAM0_A15: FPGA1S.V5 U5.20 | length 25.6
  Top Layer w0.2: U5.20@52.21,27.49 53.16,27.49 53.17,27.5 53.65,27.5 55.15,26 v1(61.65,26) ; v1(75.55,27.9) FPGA1S.V5@76.05,28.4
  MidLayer1 w0.127: 74.05,27.4 75.05,27.4 75.25,27.6
  MidLayer1 w0.2: v1(61.65,26) 70.05,26 71.65,27.6 73.85,27.6 74.05,27.4 ; 75.25,27.6 v1(75.55,27.9)
SRAM0_A16: FPGA1S.V4 U5.19 | length 24.4
  Top Layer w0.2: U5.19@52.21,28.29 53.75,28.29 55.44,26.6 v1(60.65,26.6) ; v1(74.55,27.9) FPGA1S.V4@75.05,28.4
  MidLayer1 w0.2: v1(60.65,26.6) 62.55,26.6 ; 62.55,26.7 62.65,26.6 69.95,26.6 71.35,28 74.15,28 74.25,27.9 v1(74.55,27.9)
SRAM0_A17: FPGA1S.U5 U5.18 | length 26.2
  Top Layer w0.2: U5.18@52.21,29.09 53.85,29.09 55.74,27.2 v1(61.65,27.2) ; v1(75.55,28.9) FPGA1S.U5@76.05,29.4
  MidLayer1 w0.127: 74.05,28.4 75.05,28.4
  MidLayer1 w0.2: v1(61.65,27.2) 62.65,28.2 66.15,28.2 66.95,27.4 69.95,27.4 70.95,28.4 74.05,28.4 ; 75.05,28.4 v1(75.55,28.9)
SRAM0_A18: FPGA1S.U6 U5.28 | length 14.4
  Top Layer w0.2: U5.28@63.36,29.89 64.76,29.89 v1(64.95,29.7) ; v1(75.55,29.9) 76.55,29.9 FPGA1S.U6@77.05,29.4
  MidLayer1 w0.127: 74.05,29.4 75.05,29.4
  MidLayer1 w0.2: v1(64.95,29.7) 65.25,29.4 73.05,29.4 73.15,29.3 73.85,29.3 73.95,29.4 74.05,29.4 ; 75.05,29.4 v1(75.55,29.9)
SRAM0_D0: FPGA1S.L4 U5.7 | length 24.3
  Top Layer w0.2: U5.7@52.21,37.89 61.24,37.89 v1(61.25,37.9) ; v1(74.55,34.9) FPGA1S.L4@75.05,35.4
  MidLayer1 w0.127: 73.05,35.4 74.05,35.4
  MidLayer1 w0.2: v1(61.25,37.9) 64.15,37.9 65.95,36.1 69.15,36.1 69.85,35.4 73.05,35.4 ; 74.05,35.4 v1(74.55,34.9)
SRAM0_D1: FPGA1S.L3 U5.8 | length 23
  Top Layer w0.2: U5.8@52.21,37.09 61.74,37.09 v1(61.75,37.1) ; v1(73.55,34.9) FPGA1S.L3@74.05,35.4
  MidLayer1 w0.2: v1(61.75,37.1) 64.25,37.1 65.65,35.7 68.85,35.7 69.65,34.9 v1(73.55,34.9)
SRAM0_D2: FPGA1S.M5 U5.9 | length 25.5
  Top Layer w0.2: U5.9@52.21,36.29 61.24,36.29 v1(61.25,36.3) ; v1(75.55,33.9) FPGA1S.M5@76.05,34.4
  MidLayer2 w0.127: 73.05,33.4 75.05,33.4
  MidLayer2 w0.2: v1(61.25,36.3) 67.65,36.3 70.55,33.4 73.05,33.4 ; 75.05,33.4 v1(75.55,33.9)
SRAM0_D3: FPGA1S.M4 U5.10 | length 23.7
  Top Layer w0.2: U5.10@52.21,35.49 59.64,35.49 v1(59.65,35.5) ; v1(74.55,33.9) FPGA1S.M4@75.05,34.4
  MidLayer1 w0.127: 73.05,34.4 74.05,34.4
  MidLayer1 w0.2: v1(59.65,35.5) 64.55,35.5 64.75,35.3 68.65,35.3 69.55,34.4 73.05,34.4 ; 74.05,34.4 v1(74.55,33.9)
SRAM0_D4: FPGA1S.M3 U5.13 | length 22.8
  Top Layer w0.2: U5.13@52.21,33.09 53.06,33.09 53.25,32.9 58.65,32.9 v1(59.05,33.3) ; v1(73.55,33.9) FPGA1S.M3@74.05,34.4
  MidLayer1 w0.2: v1(59.05,33.3) 61.55,33.3 61.65,33.2 62.45,33.2 62.55,33.3 65.85,33.3 66.05,33.1 67.95,33.1 68.75,33.9 v1(73.55,33.9)
SRAM0_D5: FPGA1S.N4 U5.14 | length 24
  Top Layer w0.2: U5.14@52.21,32.29 59.44,32.29 v1(59.65,32.5) ; v1(74.55,32.9) FPGA1S.N4@75.05,33.4
  MidLayer1 w0.127: 73.05,33.4 74.05,33.4
  MidLayer1 w0.2: v1(59.65,32.5) 60.05,32.9 61.15,32.9 61.25,32.8 63.25,32.8 63.35,32.9 65.65,32.9 65.85,32.7 71.75,32.7 71.95,32.9 72.45,33.4 73.05,33.4 ; 74.05,33.4 v1(74.55,32.9)
SRAM0_D6: FPGA1S.N3 U5.15 | length 22.8
  Top Layer w0.2: U5.15@52.21,31.49 59.94,31.49 v1(59.95,31.5) ; v1(73.55,32.9) FPGA1S.N3@74.05,33.4
  MidLayer1 w0.2: v1(59.95,31.5) 60.75,32.3 63.65,32.3 63.85,32.5 65.35,32.5 65.55,32.3 71.95,32.3 72.55,32.9 v1(73.55,32.9)
SRAM0_D7: FPGA1S.T5 U5.16 | length 24.3
  Top Layer w0.2: U5.16@52.21,30.69 60.64,30.69 v1(60.65,30.7) ; v1(75.55,30.9) FPGA1S.T5@76.05,30.4
  MidLayer1 w0.2: v1(60.65,30.7) 64.75,30.7 65.15,31.1 66.75,31.1 66.95,30.9 v1(75.55,30.9)
SRAM0_D8: FPGA1S.T4 U5.29 | length 12.3
  Top Layer w0.2: U5.29@63.36,30.69 65.76,30.69 v1(65.95,30.5) ; v1(74.55,29.9) FPGA1S.T4@75.05,30.4
  MidLayer1 w0.127: 73.05,30.4 74.05,30.4
  MidLayer1 w0.2: v1(65.95,30.5) 66.55,30.5 66.75,30.3 72.95,30.3 73.05,30.4 ; 74.05,30.4 v1(74.55,29.9)
SRAM0_D9: FPGA1S.T6 U5.30 | length 15.2
  Top Layer w0.2: U5.30@63.36,31.49 64.54,31.49 64.55,31.5 v1(64.65,31.5) ; v1(76.55,31.9) 76.55,30.9 FPGA1S.T6@77.05,30.4
  MidLayer1 w0.2: v1(64.65,31.5) 67.05,31.5 67.25,31.3 74.95,31.3 75.55,31.9 v1(76.55,31.9)
SRAM0_D10: FPGA1S.M6 U5.31 | length 19
  Top Layer w0.2: v1(61.75,31.7) 62.34,32.29 U5.31@63.36,32.29 ; v1(76.55,32.9) 76.55,33.9 FPGA1S.M6@77.05,34.4
  MidLayer1 w0.127: 72.95,32.4 75.05,32.4
  MidLayer1 w0.2: v1(61.75,31.7) 63.85,31.7 64.25,32.1 65.15,32.1 65.35,31.9 72.45,31.9 72.95,32.4 ; 75.05,32.4 75.15,32.5 76.15,32.5 v1(76.55,32.9)
SRAM0_D11: FPGA1S.N2 U5.32 | length 10.6
  Top Layer w0.2: U5.32@63.36,33.09 63.96,33.09 64.95,32.1 70.85,32.1 71.65,32.9 72.55,32.9 FPGA1S.N2@73.05,33.4
SRAM0_D12: FPGA1S.N1 U5.35 | length 9.9
  Top Layer w0.2: U5.35@63.36,35.49 64.14,35.49 64.55,35.9 68.684,35.9 71.184,33.4 FPGA1S.N1@72.05,33.4
SRAM0_D13: FPGA1S.M2 U5.36 | length 11.1
  Top Layer w0.2: U5.36@63.36,36.29 64.34,36.29 64.55,36.5 68.65,36.5 71.25,33.9 72.55,33.9 FPGA1S.M2@73.05,34.4
SRAM0_D14: FPGA1S.M1 U5.37 | length 9.8
  Top Layer w0.2: U5.37@63.36,37.09 64.46,37.09 64.65,36.9 68.85,36.9 71.35,34.4 FPGA1S.M1@72.05,34.4
SRAM0_D15: FPGA1S.L2 U5.38 | length 11.1
  Top Layer w0.2: U5.38@63.36,37.89 64.36,37.89 64.95,37.3 69.05,37.3 71.45,34.9 72.55,34.9 FPGA1S.L2@73.05,35.4
SRAM0_E: FPGA1S.L5 U5.6 | length 26
  Top Layer w0.2: U5.6@52.21,38.69 61.74,38.69 v1(61.75,38.7) ; v1(75.55,34.9) FPGA1S.L5@76.05,35.4
  MidLayer2 w0.127: 73.05,34.4 75.05,34.4
  MidLayer2 w0.2: v1(61.75,38.7) 65.85,38.7 70.15,34.4 73.05,34.4 ; 75.05,34.4 v1(75.55,34.9)
SRAM0_LB: FPGA1S.L1 U5.39 | length 10.1
  Top Layer w0.2: U5.39@63.36,38.69 64.16,38.69 65.15,37.7 69.25,37.7 71.55,35.4 FPGA1S.L1@72.05,35.4
SRAM0_OE: FPGA1S.K1 U5.41 | length 10.4
  Top Layer w0.2: U5.41@63.36,40.29 63.96,40.29 65.75,38.5 69.85,38.5 ; FPGA1S.K1@72.05,36.4 71.663,36.787 71.563,36.787 69.915,38.435 ; 69.85,38.5 69.915,38.435 ; 69.85,38.5 69.915,38.435
SRAM0_UB: FPGA1S.K2 U5.40 | length 11.4
  Top Layer w0.2: U5.40@63.36,39.49 64.06,39.49 65.45,38.1 69.45,38.1 71.65,35.9 72.55,35.9 FPGA1S.K2@73.05,36.4
SRAM0_WE: FPGA1S.U4 U5.17 | length 24.1
  Top Layer w0.2: U5.17@52.21,29.89 53.86,29.89 55.65,28.1 v1(60.65,28.1) ; v1(74.55,28.9) FPGA1S.U4@75.05,29.4
  MidLayer1 w0.2: v1(60.65,28.1) 61.45,28.9 v1(74.55,28.9)
SRAM1_A0: FPGA1S.K21 U6.5 | length 11.5
  Top Layer w0.2: FPGA1S.K21@92.05,36.4 92.55,35.9 94.55,35.9 94.75,36.1 94.75,36.7 96.25,38.2 99.45,38.2 100.65,39.4 U6.5@101.575,39.4
SRAM1_A1: FPGA1S.K22 U6.4 | length 10.1
  Top Layer w0.2: FPGA1S.K22@93.05,36.4 93.85,36.4 96.05,38.6 99.15,38.6 100.75,40.2 U6.4@101.575,40.2
SRAM1_A2: FPGA1S.K20 U6.3 | length 12.4
  Top Layer w0.2: FPGA1S.K20@91.05,36.4 91.55,36.9 93.75,36.9 95.85,39 98.75,39 100.75,41 U6.3@101.575,41
SRAM1_A3: FPGA1S.G21 U6.2 | length 10.9
  Top Layer w0.2: FPGA1S.G21@92.05,39.4 92.55,38.9 95.15,38.9 95.65,39.4 98.55,39.4 100.95,41.8 U6.2@101.55,41.8
SRAM1_A4: FPGA1S.G22 U6.1 | length 10.1
  Top Layer w0.2: FPGA1S.G22@93.05,39.4 94.95,39.4 95.35,39.8 98.35,39.8 99.35,40.8 99.35,41.2 100.75,42.6 U6.1@101.575,42.6
SRAM1_A5: FPGA1S.M17 U6.44 | length 28.7
  Top Layer w0.2: FPGA1S.M17@88.05,34.4 v1(88.55,34.9) ; v1(103.75,39.4) 104.85,40.5 108.55,40.5 110.65,42.6 U6.44@112.725,42.6
  MidLayer1 w0.127: 89.05,35.4 89.05,36.4 ; 90.05,37.4 91.05,37.4
  MidLayer1 w0.2: v1(88.55,34.9) 89.05,35.4 ; 89.05,36.4 90.05,37.4 ; 91.05,37.4 100.45,37.4 101.55,38.5 102.45,39.4 v1(103.75,39.4)
SRAM1_A6: FPGA1S.L18 U6.43 | length 26.5
  Top Layer w0.2: FPGA1S.L18@89.05,35.4 v1(89.55,35.9) ; v1(103.15,38.7) 103.95,38.7 105.15,39.9 108.75,39.9 110.65,41.8 U6.43@112.725,41.8
  MidLayer1 w0.127: 90.05,36.4 91.05,36.4
  MidLayer1 w0.2: v1(89.55,35.9) 90.05,36.4 ; 91.05,36.4 96.45,36.4 96.65,36.2 99.95,36.2 102.45,38.7 v1(103.15,38.7)
SRAM1_A7: FPGA1S.K19 U6.42 | length 25.1
  Top Layer w0.2: FPGA1S.K19@90.05,36.4 v1(90.55,35.9) ; v1(103.95,38.1) 107.75,38.1 110.65,41 ; 110.65,41 U6.42@112.725,41
  MidLayer1 w0.2: v1(90.55,35.9) 92.35,35.9 92.45,35.8 100.15,35.8 102.45,38.1 v1(103.95,38.1)
SRAM1_A8: FPGA1S.V19 U6.27 | length 24.7
  Top Layer w0.2: FPGA1S.V19@90.05,28.4 v1(90.55,27.9) ; v1(104.05,26.9) 108.75,26.9 110.85,29 U6.27@112.725,29
  MidLayer1 w0.127: 91.05,27.4 92.05,27.4
  MidLayer1 w0.2: v1(90.55,27.9) 91.05,27.4 ; 92.05,27.4 93.05,27.4 94.15,26.3 101.35,26.3 101.95,26.9 v1(104.05,26.9)
SRAM1_A9: FPGA1S.W20 U6.26 | length 23.2
  Top Layer w0.2: FPGA1S.W20@91.05,27.4 v1(91.55,26.9) ; v1(103.35,26.3) 108.95,26.3 110.85,28.2 U6.26@112.725,28.2
  MidLayer1 w0.2: v1(91.55,26.9) 92.85,26.9 93.85,25.9 101.65,25.9 102.05,26.3 v1(103.35,26.3)
SRAM1_A10: FPGA1S.W19 U6.25 | length 24.2
  Top Layer w0.2: FPGA1S.W19@90.05,27.4 v1(90.55,26.9) ; v1(104.05,25.7) 109.15,25.7 110.85,27.4 U6.25@112.725,27.4
  MidLayer1 w0.127: 91.05,26.4 92.05,26.4
  MidLayer1 w0.2: v1(90.55,26.9) 91.05,26.4 ; 92.05,26.4 92.75,26.4 93.65,25.5 101.95,25.5 102.15,25.7 v1(104.05,25.7)
SRAM1_A11: FPGA1S.Y20 U6.24 | length 22.9
  Top Layer w0.2: FPGA1S.Y20@91.05,26.4 v1(91.55,25.9) ; v1(103.35,25.1) 109.35,25.1 110.85,26.6 U6.24@112.725,26.6 U6.24@112.75,26.6
  MidLayer1 w0.2: v1(91.55,25.9) 92.55,25.9 93.35,25.1 v1(103.35,25.1)
SRAM1_A12: FPGA1S.Y21 U6.23 | length 22
  Top Layer w0.2: FPGA1S.Y21@92.05,26.4 92.55,25.9 93.35,25.9 94.75,24.5 109.55,24.5 110.85,25.8 U6.23@112.725,25.8 U6.23@112.75,25.8
SRAM1_A13: FPGA1S.Y22 U6.22 | length 9.5
  Top Layer w0.2: FPGA1S.Y22@93.05,26.4 93.65,26.4 95.15,24.9 99.75,24.9 100.65,25.8 U6.22@101.575,25.8
SRAM1_A14: FPGA1S.W21 U6.21 | length 10.9
  Top Layer w0.2: FPGA1S.W21@92.05,27.4 92.55,26.9 93.75,26.9 95.35,25.3 99.25,25.3 100.55,26.6 U6.21@101.575,26.6
SRAM1_A15: FPGA1S.W22 U6.20 | length 9.9
  Top Layer w0.2: FPGA1S.W22@93.05,27.4 93.85,27.4 95.15,26.1 95.55,25.7 98.95,25.7 100.65,27.4 U6.20@101.575,27.4
SRAM1_A16: FPGA1S.V21 U6.19 | length 11.3
  Top Layer w0.2: FPGA1S.V21@92.05,28.4 92.55,27.9 93.95,27.9 95.203,26.647 95.75,26.1 98.65,26.1 100.75,28.2 U6.19@101.575,28.2
SRAM1_A17: FPGA1S.V22 U6.18 | length 10.5
  Top Layer w0.2: FPGA1S.V22@93.05,28.4 94.05,28.4 95.95,26.5 98.45,26.5 99.75,27.8 99.75,28.1 100.65,29 U6.18@101.575,29
SRAM1_A18: FPGA1S.V20 U6.28 | length 23.7
  Top Layer w0.2: FPGA1S.V20@91.05,28.4 v1(91.55,27.9) ; v1(103.05,27.5) 108.55,27.5 110.85,29.8 U6.28@112.725,29.8 U6.28@112.75,29.8
  MidLayer1 w0.2: v1(91.55,27.9) 93.25,27.9 94.45,26.7 101.05,26.7 101.85,27.5 v1(103.05,27.5)
SRAM1_D0: FPGA1S.L21 U6.7 | length 11.5
  Top Layer w0.2: FPGA1S.L21@92.05,35.4 92.55,34.9 95.15,34.9 95.55,35.3 95.55,36.3 96.65,37.4 100.15,37.4 100.55,37.8 U6.7@101.575,37.8
SRAM1_D1: FPGA1S.M22 U6.8 | length 10.4
  Top Layer w0.2: FPGA1S.M22@93.05,34.4 99.45,34.4 99.65,34.6 99.65,35.6 100.15,36.1 100.15,36.4 100.75,37 U6.8@101.575,37
SRAM1_D2: FPGA1S.M21 U6.9 | length 11.6
  Top Layer w0.2: FPGA1S.M21@92.05,34.4 92.55,33.9 99.85,33.9 100.05,34.1 100.05,35.4 100.55,35.9 100.55,36.1 100.65,36.2 101.55,36.2 U6.9@101.575,36.2
SRAM1_D3: FPGA1S.N22 U6.10 | length 10.1
  Top Layer w0.2: FPGA1S.N22@93.05,33.4 99.95,33.4 100.45,33.9 100.45,35.2 100.65,35.4 U6.10@101.575,35.4
SRAM1_D4: FPGA1S.N21 U6.13 | length 9.8
  Top Layer w0.2: FPGA1S.N21@92.05,33.4 92.55,32.9 94.25,32.9 94.35,33 99.65,33 U6.13@101.575,33
SRAM1_D5: FPGA1S.U20 U6.14 | length 12.5
  Top Layer w0.2: FPGA1S.U20@91.05,29.4 91.55,29.9 91.55,30.7 91.75,30.9 93.65,30.9 95.35,32.6 99.35,32.6 99.75,32.2 U6.14@101.575,32.2
SRAM1_D6: FPGA1S.T22 U6.15 | length 9.6
  Top Layer w0.2: FPGA1S.T22@93.05,30.4 93.85,30.4 95.65,32.2 98.95,32.2 99.75,31.4 U6.15@101.575,31.4
SRAM1_D7: FPGA1S.T21 U6.16 | length 10.4
  Top Layer w0.2: FPGA1S.T21@92.05,30.4 92.55,29.9 94.05,29.9 94.15,30 95.35,30 95.75,29.6 99.85,29.6 100.85,30.6 U6.16@101.575,30.6
SRAM1_D8: FPGA1S.V18 U6.29 | length 26.1
  Top Layer w0.2: FPGA1S.V18@89.05,28.4 v1(89.55,27.9) ; v1(103.75,28.1) 108.25,28.1 110.75,30.6 U6.29@112.725,30.6
  MidLayer1 w0.127: 90.05,28.4 92.05,28.4
  MidLayer1 w0.2: v1(89.55,27.9) 90.05,28.4 ; 92.05,28.4 93.45,28.4 94.75,27.1 100.75,27.1 101.75,28.1 v1(103.75,28.1)
SRAM1_D9: FPGA1S.U19 U6.30 | length 25.1
  Top Layer w0.2: FPGA1S.U19@90.05,29.4 v1(90.55,28.9) ; v1(104.45,28.7) 108.05,28.7 110.75,31.4 U6.30@112.725,31.4
  MidLayer1 w0.2: v1(90.55,28.9) 93.55,28.9 94.95,27.5 100.55,27.5 101.75,28.7 v1(104.45,28.7)
SRAM1_D10: FPGA1S.U18 U6.31 | length 25.8
  Top Layer w0.2: FPGA1S.U18@89.05,29.4 v1(89.55,28.9) ; v1(103.75,29.3) 107.85,29.3 110.75,32.2 U6.31@112.725,32.2
  MidLayer1 w0.127: 90.05,29.4 91.05,29.4
  MidLayer1 w0.2: v1(89.55,28.9) 90.05,29.4 ; 91.05,29.4 93.75,29.4 94.45,28.7 100.75,28.7 101.15,29.1 103.45,29.1 v1(103.75,29.3)
SRAM1_D11: FPGA1S.T18 U6.32 | length 25.3
  Top Layer w0.2: FPGA1S.T18@89.05,30.4 v1(89.55,29.9) ; v1(102.95,29.8) 103.35,30 107.65,30 110.65,33 U6.32@112.725,33
  MidLayer1 w0.2: v1(89.55,29.9) 92.95,29.9 93.05,30 95.55,30 95.75,29.8 v1(102.95,29.8)
SRAM1_D12: FPGA1S.R18 U6.35 | length 25.7
  Top Layer w0.2: FPGA1S.R18@89.05,31.4 v1(89.55,31.9) ; v1(103.35,32.1) 107.55,32.1 110.95,35.5 111.45,35.5 111.55,35.4 U6.35@112.725,35.4
  MidLayer1 w0.2: v1(89.55,31.9) 89.95,32.3 90.15,32.5 102.05,32.5 102.45,32.1 v1(103.35,32.1)
SRAM1_D13: FPGA1S.T17 U6.36 | length 27.8
  Top Layer w0.2: FPGA1S.T17@88.05,30.4 88.55,30.9 v1(88.55,31.9) ; v1(105.05,32.7) 107.25,32.7 110.75,36.2 U6.36@112.725,36.2
  MidLayer1 w0.2: v1(88.55,31.9) 89.55,32.9 102.35,32.9 102.55,32.7 v1(105.05,32.7)
SRAM1_D14: FPGA1S.M18 U6.37 | length 25.7
  Top Layer w0.2: FPGA1S.M18@89.05,34.4 v1(89.55,33.9) ; v1(105.05,33.8) 107.55,33.8 110.75,37 U6.37@112.725,37
  MidLayer1 w0.2: v1(89.55,33.9) 90.15,33.3 102.55,33.3 102.65,33.2 104.45,33.2 v1(105.05,33.8)
SRAM1_D15: FPGA1S.M20 U6.38 | length 23.5
  Top Layer w0.2: FPGA1S.M20@91.05,34.4 v1(91.55,33.9) ; v1(105.15,35.4) 108.35,35.4 110.75,37.8 U6.38@112.725,37.8
  MidLayer1 w0.2: v1(91.55,33.9) 101.05,33.9 102.55,35.4 v1(105.15,35.4)
SRAM1_E: FPGA1S.L22 U6.6 | length 10.3
  Top Layer w0.2: FPGA1S.L22@93.05,35.4 94.75,35.4 95.15,35.8 95.15,36.5 96.45,37.8 99.85,37.8 100.65,38.6 U6.6@101.575,38.6
SRAM1_LB: FPGA1S.M19 U6.39 | length 24.8
  Top Layer w0.2: FPGA1S.M19@90.05,34.4 v1(90.55,33.9) ; v1(103.05,36.2) 108.25,36.2 110.65,38.6 U6.39@112.725,38.6
  MidLayer1 w0.127: 91.05,34.4 92.05,34.4
  MidLayer1 w0.2: v1(90.55,33.9) 91.05,34.4 ; 92.05,34.4 100.85,34.4 102.65,36.2 v1(103.05,36.2)
SRAM1_OE: FPGA1S.L19 U6.41 | length 25.2
  Top Layer w0.2: FPGA1S.L19@90.05,35.4 v1(90.55,34.9) ; v1(103.05,37.5) 107.95,37.5 110.65,40.2 U6.41@112.725,40.2
  MidLayer1 w0.2: v1(90.55,34.9) 91.15,35.5 92.15,35.5 92.25,35.4 100.45,35.4 102.55,37.5 v1(103.05,37.5)
SRAM1_UB: FPGA1S.L20 U6.40 | length 23.7
  Top Layer w0.2: FPGA1S.L20@91.05,35.4 v1(91.55,34.9) ; v1(103.75,36.9) 108.15,36.9 110.65,39.4 U6.40@112.725,39.4
  MidLayer1 w0.2: v1(91.55,34.9) 100.65,34.9 102.65,36.9 v1(103.75,36.9)
SRAM1_WE: FPGA1S.U21 U6.17 | length 10.2
  Top Layer w0.2: FPGA1S.U21@92.05,29.4 92.55,28.9 94.35,28.9 94.45,28.8 95.35,28.8 95.75,29.2 100.05,29.2 100.65,29.8 U6.17@101.575,29.8
SW_DIP0: FPGA1S.Y6 R11.1 S1.1 | length 47
  Top Layer w0.2: v1(76.55,25.9) FPGA1S.Y6@77.05,26.4
  MidLayer1 w0.2: S1.1@49.53,4 52.53,7 68.85,7 71.75,9.9 71.75,19.3 76.55,24.1 v1(76.55,25.9)
  Bottom Layer w0.3: R11.1@46.55,2.45 47.98,2.45 S1.1@49.53,4
SW_DIP1: FPGA1S.V6 R12.1 S1.2 | length 49.5
  Top Layer w0.2: v1(76.55,27.9) FPGA1S.V6@77.05,28.4
  MidLayer1 w0.2: S1.2@52.07,4 54.67,6.6 69.05,6.6 72.15,9.7 72.15,19.1 76.832,23.782 77.15,24.1 77.15,27.3 v1(76.55,27.9)
  Bottom Layer w0.3: R12.1@48.26,7.305 48.26,6.19 48.65,5.8 50.27,5.8 S1.2@52.07,4
SW_DIP2: FPGA1S.U7 R13.1 S1.3 | length 48.3
  Top Layer w0.2: v1(77.55,29.9) FPGA1S.U7@78.05,29.4
  MidLayer1 w0.2: S1.3@54.61,4 56.81,6.2 69.25,6.2 72.55,9.5 72.55,16.9 77.95,22.3 77.95,27.3 78.35,27.7 78.35,29.1 v1(77.55,29.9)
  Bottom Layer w0.3: R13.1@52.07,6.67 52.07,5.68 52.25,5.5 53.11,5.5 S1.3@54.61,4
SW_DIP3: FPGA1S.AA4 R14.1 S1.4 | length 37.4
  Top Layer w0.2: S1.4@57.15,4 61.95,8.8 70.05,8.8 71.05,9.8 71.05,15 74.55,18.5 74.55,24.9 FPGA1S.AA4@75.05,25.4
  Bottom Layer w0.3: R14.1@55.88,7.305 55.88,5.27 S1.4@57.15,4
SW_DIP4: FPGA1S.AB4 R15.1 S1.5 | length 33.1
  Top Layer w0.2: S1.5@59.69,4 63.89,8.2 70.15,8.2 71.55,9.6 71.55,14.9 75.05,18.4 FPGA1S.AB4@75.05,24.4
  Bottom Layer w0.3: S1.5@59.69,4 R15.1@59.69,6.67